# Altium PCB PCI Express Mini_3000X5095_52PIN_Full-Mini-Type F1.PCBDOC (part 7 of 8)
Units mm, origin at the board's own origin, x right, y up, seen from the top; angles counter-clockwise.
Board outline 70 x 83.2 mm, 6 copper layers (TopLayer, Layer 1, Layer 2, Layer 3, Layer 4, Bottom Layer), stack 0.914 mm thick; 380 components, 252 nets, 1258 pads, 603 vias.
Unrouted connection lines stored in the file: 10.
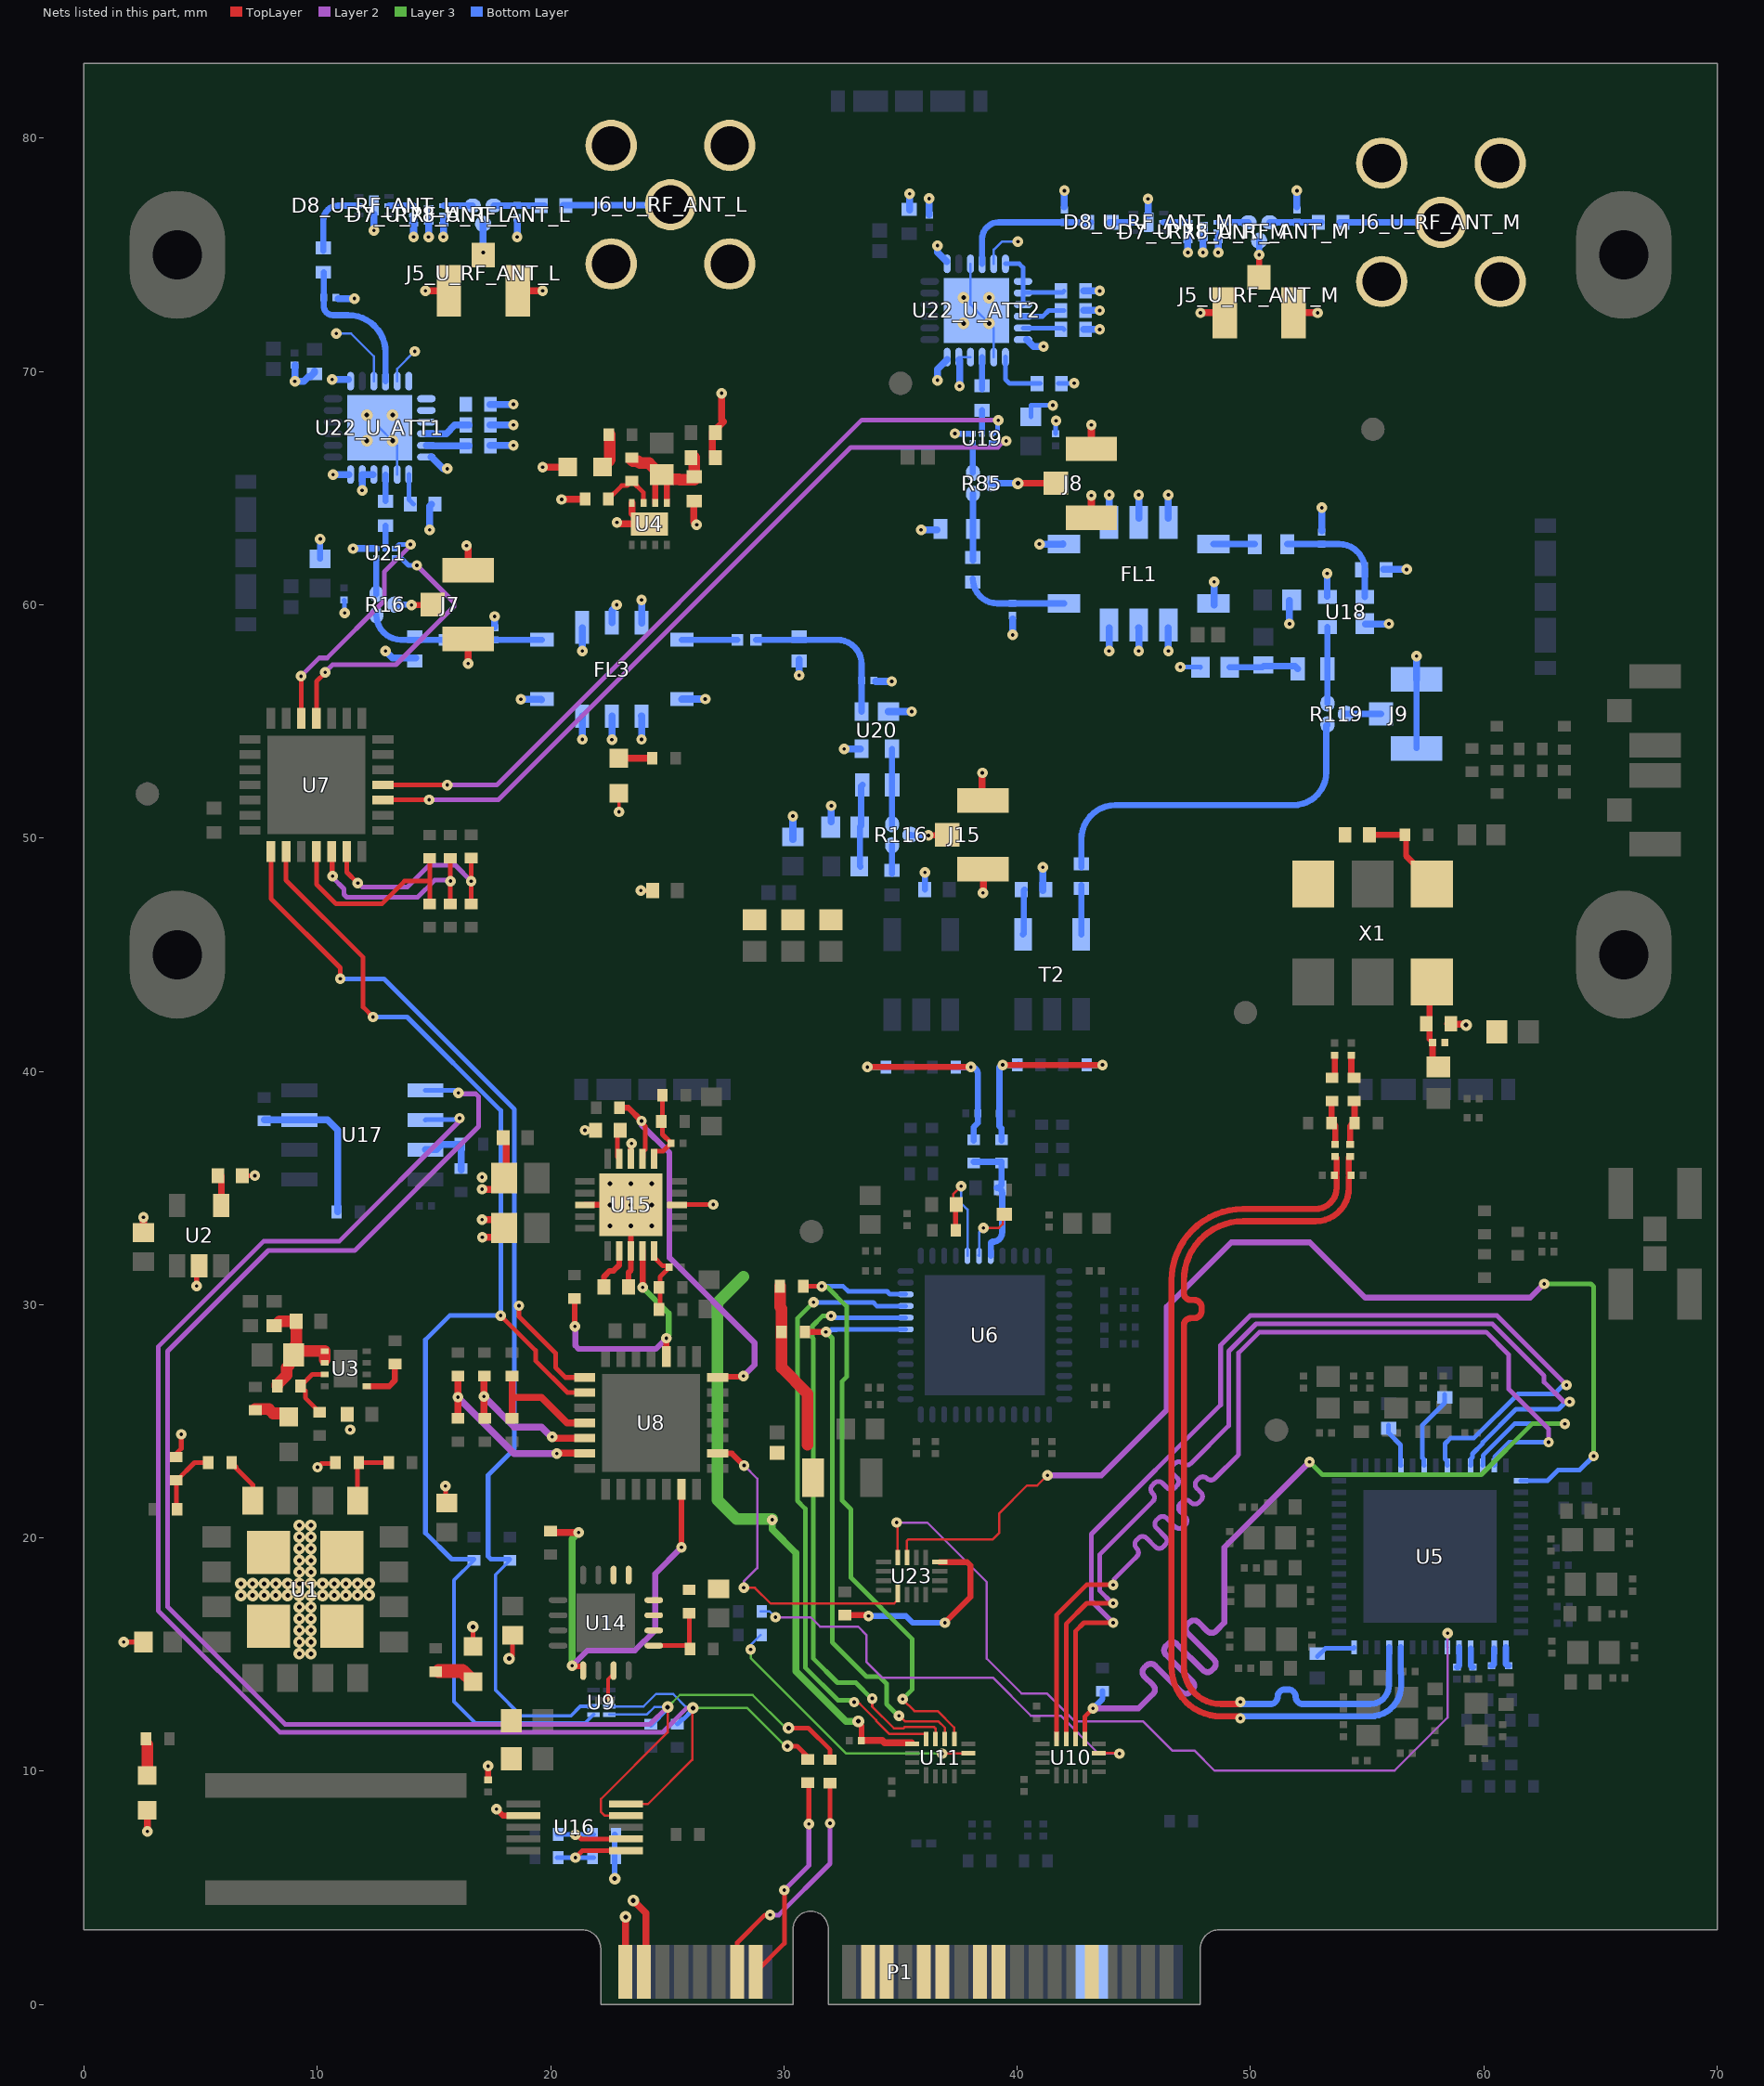
[diagram p8: the nets of this part, all layers, seen from the top]

## Via types
v1: diameter 0.45, hole 0.15, TopLayer to Bottom Layer, tented both sides, 332 vias
v2: diameter 0.5, hole 0.2, TopLayer to Bottom Layer, tented both sides, 214 vias
v3: diameter 0.5, hole 0.2, TopLayer to Bottom Layer, 32 vias
v4: diameter 0.45, hole 0.15, TopLayer to Bottom Layer, 25 vias

## Nets (pads, with @x,y where several pads share a name; then routed paths per layer and width w, separated by ;. In a path a pad name is that pad's centre, name@x,y a point inside that pad or via, vN(x,y) a via of type N, cw(c..) or ccw(c..) an arc to the next point about the centre after c; other vN are vias at no path point) (continued)
GND_ATT_U_ATT1: C4.1 C11.1 C12.1 C13.1 C48.1 C49.1 C156.2 C158.1 C161.2 C162.2 C163.1 C165.1 C166.1 C168.1 C169.1 C171.2 C172.2 C176.1 C177.1 C180_U_ATT1.1 C180_U_ATT2.1 C181_U_ATT1.1 C181_U_ATT2.1 C182_U_ATT1.2 C182_U_ATT2.2 C183_U_ATT1.2 C183_U_ATT2.2 C184_U_ATT1.2 C184_U_ATT2.2 C185_U_ATT1.2 C185_U_ATT2.2 C186_U_RF_ANT_L.1 C186_U_RF_ANT_M.1 C187_U_RF_ANT_L.1 C187_U_RF_ANT_M.1 C188.1 C190.1 D7_U_RF_ANT_L.2 D7_U_RF_ANT_L.3 D7_U_RF_ANT_L.4 D7_U_RF_ANT_L.5 D7_U_RF_ANT_L.7 D7_U_RF_ANT_M.2 D7_U_RF_ANT_M.3 D7_U_RF_ANT_M.4 D7_U_RF_ANT_M.5 D7_U_RF_ANT_M.7 D8_U_RF_ANT_L.7 D8_U_RF_ANT_M.7 D10.2 D13.2 FB32.2 FB33.2 FB34.2 FL1.A FL1.B FL1.C FL1.E FL1.F FL1.G FL1.H FL1.K FL3.1 FL3.2 FL3.3 FL3.6 FL3.7 FL3.8 FL3.9 FL3.10 J5_U_RF_ANT_L.1 J5_U_RF_ANT_L.3 J5_U_RF_ANT_M.1 J5_U_RF_ANT_M.3 J6_U_RF_ANT_L.MH J6_U_RF_ANT_M.MH J7.1 J7.3 J8.1 J8.3 J9.1 J9.3 J15.1 J15.3 L11.1 R9.1 U4.4 U4.9 U18.2 U18.4 U19.4 U20.2 U20.4 U21.4 U22_U_ATT1.1 U22_U_ATT1.3 U22_U_ATT1.5 U22_U_ATT1.12 U22_U_ATT1.14 U22_U_ATT1.16 U22_U_ATT1.17 U22_U_ATT1.18 U22_U_ATT1.25 U22_U_ATT2.1 U22_U_ATT2.3 U22_U_ATT2.5 U22_U_ATT2.12 U22_U_ATT2.14 U22_U_ATT2.16 U22_U_ATT2.17 U22_U_ATT2.18 U22_U_ATT2.25 | length 99
  TopLayer w0.15: v1(22.93,51.122) D10.2@22.93,51.922
  TopLayer w0.2: v1(23.869,47.75) C4.1@24.45,47.75
  TopLayer w0.3: v1(14.639,73.461) 15.637,73.461 J5_U_RF_ANT_L.3@15.64,73.457 ; v1(16.399,62.534) 16.399,62.507 16.472,62.435 J7.1@16.472,61.536 ; v1(16.472,57.48) J7.3@16.472,58.478 ; J5_U_RF_ANT_L.1@18.658,73.46 18.662,73.457 v1(19.66,73.457) ; v1(19.66,65.9) D13.2@20.657,65.9 ; v1(20.472,64.516) R9.1@21.47,64.516 ; v1(22.843,63.525) 22.905,63.463 U4.9@23.903,63.463 ; U4.4@23.484,64.363 23.484,63.913 23.934,63.463 U4.9@24.234,63.463 ; C11.1@26.14,64.549 26.14,63.551 v1(26.262,63.428) ; C12.1@26.932,66.306 C13.1@26.932,67.381 ; C13.1@26.939,67.381 27.407,67.849 27.33,67.925 v1(27.33,69.067) ; J15.1@38.488,52.008 v1@38.488,52.772 ; v1@38.553,47.674 J15.3@38.553,48.438 ; J8.3@43.179,63.996 v1(43.179,64.682) ; J8.1@43.179,67.018 v1(43.179,67.704) ; v1(47.854,72.514) 48.852,72.514 J5_U_RF_ANT_M.3@48.855,72.51 ; J5_U_RF_ANT_M.1@51.881,72.517 51.885,72.514 v1(52.883,72.514)
  Bottom Layer w0.1: v1(10.82,71.628) 11.449,71.628 12.426,70.652 U22_U_ATT1.3@12.426,69.581 ; U22_U_ATT1.25@12.676,67.581 v2(13.226,67.031) 13.426,66.831 U22_U_ATT1.14@13.426,65.581 ; U22_U_ATT1.5@13.426,69.581 13.426,70.114 v1(14.176,70.864) ; U22_U_ATT2.17@37.498,70.614 U22_U_ATT2.16@37.998,70.614 ; U22_U_ATT2.3@37.998,74.614 37.998,72.864 U22_U_ATT2.25@38.248,72.614 v2(38.798,72.064) 38.998,71.864 U22_U_ATT2.14@38.998,70.614 ; U22_U_ATT2.5@38.998,74.614 38.998,75.219 39.344,75.565 v1(40.03,75.565)
  Bottom Layer w0.2: C176.1@10.091,62.001 C176.1@10.121,61.971 ; C177.1@11.149,60.201 11.163,60.188 11.163,59.664 v1(11.176,59.651) ; C165.1@40.589,68.057 40.589,68.557 41.519,68.557 v1(41.527,68.548) ; C166.1@41.654,67.333 41.654,67.867 v1(41.67,67.883) ; C182_U_ATT2.2@41.764,69.479 42.424,69.479 v1(42.439,69.494) ; v1(46.99,57.328) 47.854,57.328 C162.2@47.86,57.322
  Bottom Layer w0.25: C176.1@10.121,61.971 10.121,62.818 v1(10.126,62.818) ; C156.2@36.042,47.788 36.044,47.79 36.044,48.52 v1(36.046,48.523) ; v1@37.335,67.329 U19.4@38.014,67.329 ; J9.1@57.119,53.847 J9.3@57.119,56.797
  Bottom Layer w0.268: U18.4@53.289,60.343 v1(53.289,61.341)
  Bottom Layer w0.3: C180_U_ATT1.1@9.041,70.268 v1(9.041,69.581) 9.427,69.581 9.621,69.775 9.706,69.775 9.881,69.95 C181_U_ATT1.1@9.881,70.025 ; v1(10.641,69.661) U22_U_ATT1.1@11.327,69.661 ; v1(10.676,65.581) U22_U_ATT1.18@11.362,65.581 ; C187_U_RF_ANT_L.1@10.902,73.126 v1(11.588,73.126) ; v1(11.532,62.409) U21.4@12.529,62.409 ; v1(11.926,64.901) U22_U_ATT1.17@11.926,65.581 U22_U_ATT1.16@12.392,65.581 ; v1(12.426,76.044) D8_U_RF_ANT_L.7@12.426,76.73 ; v1(12.922,58.019) 12.926,58.019 13.226,57.719 C48.1@14.223,57.719 ; v1(14.13,75.763) 14.13,76.555 ; v1(14.771,75.763) D7_U_RF_ANT_L.7@14.771,76.449 ; v1(14.818,63.208) 14.818,64.231 C182_U_ATT1.2@14.893,64.307 ; U22_U_ATT1.12@14.886,66.331 15.386,65.831 v1(15.569,65.831) ; v1(15.405,75.763) 15.405,76.563 ; C183_U_ATT1.2@17.412,66.831 v1(18.41,66.831) ; C184_U_ATT1.2@17.412,67.704 v1(18.41,67.704) ; C185_U_ATT1.2@17.412,68.591 v1(18.41,68.591) ; C190.1@17.598,59.054 v1(17.598,59.5) ; v1(18.57,75.763) C186_U_RF_ANT_L.1@18.57,76.449 ; v1(18.725,55.947) 18.731,55.953 19.594,55.953 FL3.10@19.616,55.931 ; FL3.9@21.357,55.229 21.36,55.225 v1(21.36,54.227) ; v1(21.36,58.02) FL3.1@21.36,59.018 ; FL3.8@22.627,55.223 22.63,55.22 v1(22.63,54.222) ; FL3.2@22.63,59.229 22.63,59.774 22.83,59.973 v1(22.83,59.995) ; FL3.7@23.897,55.229 23.9,55.225 v1(23.9,54.227) ; v1(23.9,60.21) FL3.3@23.9,59.229 23.9,59.212 FL3.3@23.903,59.209 ; FL3.6@25.628,55.956 FL3.6@25.63,55.959 v1(26.63,55.959) ; v1(30.384,50.94) C171.2@30.384,50.053 30.384,49.943 C171.2@30.388,49.939 ; v1(30.655,56.972) C49.1@30.655,57.658 ; C172.2@32.033,50.698 v1(32.033,51.384) ; v1(32.584,53.816) U20.4@33.27,53.816 ; C188.1@33.933,56.714 v1(34.619,56.714) ; U20.2@34.478,55.418 34.481,55.422 U20.2@34.483,55.422 v1(35.479,55.422) ; C181_U_ATT2.1@35.385,76.926 v1(35.385,77.612) ; v1(35.881,63.208) L11.1@36.567,63.208 ; C180_U_ATT2.1@36.229,76.726 v1(36.229,77.412) ; v1(36.581,69.623) 36.581,70.1 U22_U_ATT2.18@36.998,70.518 ; v1(36.581,75.393) 36.581,75.108 U22_U_ATT2.1@36.982,74.707 ; v1(37.328,67.336) v1@37.335,67.329 ; U22_U_ATT2.17@37.498,70.494 37.529,70.463 v1(37.529,69.369) ; v1(39.803,58.709) C163.1@39.803,59.395 ; U22_U_ATT2.12@40.411,71.364 40.705,71.069 v1(41.129,71.069) ; v1(40.956,62.6) 41.953,62.6 FL1.K@41.957,62.603 ; C158.1@41.097,47.745 v1(41.097,48.743) ; 42.022,77.064 v1(42.022,77.75) ; C183_U_ATT2.2@42.854,71.801 v1(43.54,71.801) ; C184_U_ATT2.2@42.854,72.614 v1(43.54,72.614) ; C185_U_ATT2.2@42.854,73.452 v1(43.54,73.452) ; FL1.H@43.937,59.021 43.94,59.018 v1(43.94,58.02) ; v1(43.942,64.708) 43.942,63.71 FL1.A@43.945,63.707 ; FL1.G@45.207,59.021 45.21,59.018 v1(45.21,58.02) ; v1(45.21,64.708) 45.21,63.71 FL1.B@45.213,63.707 ; D8_U_RF_ANT_M.7@45.61,76.707 v1(45.61,77.393) ; FL1.F@46.477,59.021 46.48,59.018 v1(46.48,58.02) ; v1(46.477,64.708) 46.477,63.71 FL1.C@46.48,63.707 ; v1(47.316,75.098) D7_U_RF_ANT_M.4@47.316,75.593 47.316,75.844 ; v1(47.966,75.098) D7_U_RF_ANT_M.7@47.966,75.784 ; FL1.E@48.438,59.988 v1(48.438,60.985) ; v1(48.616,75.098) D7_U_RF_ANT_M.3@48.616,75.593 48.616,75.844 ; v1(51.67,59.18) C161.2@51.67,60.178 ; 51.989,77.064 v1(51.989,77.75) ; C169.1@53.061,63.163 v1(53.061,64.16) ; U18.2@54.937,59.18 v1(55.935,59.18) ; C168.1@55.696,61.515 v1(56.694,61.515) ; v1(57.119,57.795) J9.3@57.119,56.797 J9.3@57.122,56.793
  other v1: 38.534,47.655 38.507,52.791
  other v2: 12.126,67.031 12.126,68.131 13.226,68.131 37.698,72.064 37.698,73.164 38.798,73.164
GND_VCXO: C42.1 C111.1 C112.1 FB15.1 X1.3 | length 0.8
  TopLayer w0.3: C112.1@58.453,42.044 58.483,42.014 59.214,42.014 v2(59.244,41.984)
GS_330: U7.17 U19.1 | length 33.8
  TopLayer w0.2: U7.17@12.817,51.627 12.828,51.639 v1(14.794,51.639)
  Layer 2 w0.2: v1(14.794,51.639) 14.806,51.65 17.768,51.65 32.869,66.751 39.172,66.751 39.444,67.024 v1(39.53,67.024)
  Bottom Layer w0.2: U19.1@38.898,66.931 39.37,66.931 39.463,67.024 v1(39.53,67.024)
GS_ILS: U7.25 U21.1 | length 12.3
  TopLayer w0.2: U7.25@9.967,55.127 9.967,56.398 9.967,56.713 10.338,57.084 v1(10.338,57.099)
  Layer 2 w0.2: v1(10.338,57.099) 10.338,57.116 10.585,57.364 10.656,57.434 13.37,57.434 15.864,59.928 15.864,60.094 v1(14.269,61.689)
  Bottom Layer w0.2: U21.1@13.329,62.009 13.592,62.009 13.912,61.689 v1(14.269,61.689)
I2C_SCL: R66.1 R71.2 U9.3 U16.5 U17.6 | length 72.3
  TopLayer w0.1: U16.5@23.227,8.594 24.173,8.594 26.069,10.49 26.069,12.68 v2(26.099,12.711)
  TopLayer w0.2: v2(30.156,11.077) 30.568,11.077 31.025,10.62 R71.2@31.025,10.454
  Layer 2 w0.2: v1(16.101,37.991) 16.101,37.871 10.953,32.724 7.71,32.724 3.181,28.195 3.181,16.885 8.406,11.66 24.79,11.66 25.842,12.711 v2(26.099,12.711)
  Layer 3 w0.1: v2(26.099,12.711) 28.429,12.711 30.064,11.077 v2(30.156,11.077)
  Bottom Layer w0.1: U9.3@22.514,12.781 23.988,12.781 24.517,13.311 25.255,13.311 25.855,12.711 26.069,12.711 v2(26.099,12.711)
  Bottom Layer w0.2: U17.6@14.637,37.914 14.654,37.931 16.101,37.931 v1(16.101,37.991) ; R66.1@25.429,12.019 25.629,12.219 25.679,12.219 26.069,12.609 v2@26.069,12.711
I2C_SDA: R65.1 R70.2 U9.4 U16.4 U17.5 | length 75
  TopLayer w0.1: U16.4@23.227,8.094 22.327,8.094 22.167,8.254 22.167,8.815 25.019,11.666 v2(25.019,12.751)
  TopLayer w0.2: v2(30.2,11.851) 31.05,11.851 31.982,10.918 R70.2@31.982,10.441
  Layer 2 w0.2: v1(16.054,39.074) 16.092,39.036 16.799,39.036 16.916,38.919 16.916,37.63 11.61,32.324 7.9,32.324 3.581,28.005 3.581,17.05 8.622,12.01 24.256,12.01 24.997,12.751 v2(25.019,12.751)
  Layer 3 w0.1: v2(25.019,12.751) 25.539,13.271 28.661,13.271 30.081,11.851 v2(30.2,11.851)
  Bottom Layer w0.1: U9.4@22.514,12.431 24.126,12.431 24.445,12.751 v2(25.019,12.751)
  Bottom Layer w0.2: U17.5@14.637,39.184 14.639,39.181 16.088,39.181 16.088,39.109 v1(16.054,39.074) ; R65.1@24.3,11.969 25.019,12.688 v2(25.019,12.751)
LMK_CLKin0_N: C46.1 U5.33 | length 0.9
  Bottom Layer w0.267: C46.1@58.847,14.465 ccw(c58.847,14.56) 58.943,14.56 U5.33@58.943,15.306
LMK_CLKin0_P: C47.1 U5.32 | length 0.8
  Bottom Layer w0.267: U5.32@59.443,15.247 59.443,14.56 ccw(c59.538,14.56) C47.1@59.538,14.465
LMK_CLKin1_N: C59.1 U5.30 | length 0.8
  Bottom Layer w0.267: C59.1@60.323,14.519 ccw(c60.323,14.639) 60.443,14.639 U5.30@60.443,15.247
LMK_CLKin1_P: C54.1 U5.29 | length 0.9
  Bottom Layer w0.267: U5.29@60.943,15.306 60.943,14.639 ccw(c61.063,14.639) C54.1@61.063,14.519
LMK_CLKsel: U5.34 U23.12 | length 36.6
  TopLayer w0.1: v1(34.832,20.66) 34.877,20.615 U23.12@34.877,19.164
  Layer 2 w0.1: v1(34.832,20.66) 36.144,20.66 38.693,18.111 38.693,14.825 40.185,13.333 41.261,13.333 42.454,12.139 45.39,12.139 46.644,10.885 47.603,10.885 48.46,10.028 56.173,10.028 58.448,12.303 v1(58.448,15.913)
  Bottom Layer w0.1: U5.34@58.443,15.306 58.429,15.32 58.429,15.893 v1(58.448,15.913)
LMK_CLKsel_3V3: U8.23 U23.1 | length 14.3
  TopLayer w0.1: v1(28.28,17.864) 28.761,17.864 29.436,17.189 34.727,17.189 34.877,17.339 U23.1@34.877,17.614
  TopLayer w0.25: U8.23@27.16,23.629 27.166,23.624 27.774,23.624 v1(28.294,23.104)
  Layer 2 w0.1: v1(28.28,17.864) 28.28,18.135 28.857,18.712 28.857,22.54 v1(28.294,23.104)
LMK_OSC_IN_N: C39.1 C41.1 U5.38 | length 40.9
  TopLayer w0.267: v1(49.567,12.261) ccw(c49.475,12.261) 49.475,12.353 48.727,12.353 cw(c48.727,14.465) 46.615,14.465 46.615,31.035 cw(c49.682,31.035) 49.682,34.102 52.789,34.102 ccw(c52.789,35.002) 53.689,35.002 53.689,35.44 ccw(c53.593,35.44) C39.1@53.593,35.536 ccw(c53.593,35.632) 53.689,35.632 C41.1@53.689,36.296
  Bottom Layer w0.267: v1(49.567,12.261) cw(c49.658,12.261) 49.658,12.353 55.136,12.353 ccw(c55.136,13.673) 56.456,13.673 56.456,14.187 56.443,14.2 U5.38@56.443,15.306
LMK_OSC_IN_P: C44.1 C45.2 U5.39 | length 40.9
  TopLayer w0.267: v1(49.567,12.971) cw(c49.475,12.971) 49.475,12.88 48.727,12.88 cw(c48.727,14.465) 47.142,14.465 47.142,28.204 47.142,29.113 cw(c47.452,29.113) 47.452,29.423 47.593,29.423 ccw(c47.593,29.733) 47.903,29.733 47.903,29.888 ccw(c47.593,29.888) 47.593,30.198 47.452,30.198 cw(c47.452,30.508) 47.142,30.508 47.142,31.035 cw(c49.682,31.035) 49.682,33.575 52.789,33.575 ccw(c52.789,35.002) 54.216,35.002 54.216,35.44 cw(c54.313,35.44) C45.2@54.313,35.536 cw(c54.313,35.632) 54.216,35.632 C44.1@54.216,36.299
  Bottom Layer w0.267: v1(49.567,12.971) ccw(c49.658,12.971) 49.658,12.88 50.718,12.88 50.852,12.88 ccw(c50.852,13.19) 51.162,13.19 cw(c51.472,13.19) 51.472,13.5 51.627,13.5 cw(c51.627,13.19) 51.937,13.19 ccw(c52.247,13.19) 52.247,12.88 52.843,12.88 55.136,12.88 ccw(c55.136,13.673) 55.929,13.673 55.929,14.187 55.943,14.2 U5.39@55.943,15.306
LMK_SPI_CLK: U5.13 U10.12 | length 44.6
  TopLayer w0.2: U10.12@41.695,11.379 41.695,16.708 42.973,17.986 v4(44.114,17.986)
  Layer 2 w0.2: v4(44.114,17.986) 44.162,18.034 44.162,18.239 45.059,19.135 45.13,19.206 ccw(c44.958,19.378) 45.13,19.549 45.114,19.565 cw(c45.286,19.736) 45.114,19.908 45.2,19.993 cw(c45.372,19.822) 45.543,19.993 45.917,19.62 ccw(c46.088,19.791) 46.26,19.62 46.346,19.705 ccw(c46.174,19.877) 46.346,20.048 45.972,20.422 cw(c46.143,20.594) 45.972,20.765 46.058,20.851 cw(c46.229,20.679) 46.401,20.851 46.774,20.477 ccw(c46.946,20.649) 47.117,20.477 47.203,20.563 ccw(c47.032,20.734) 47.203,20.906 46.985,21.124 cw(c47.157,21.296) 46.985,21.467 47.071,21.553 cw(c47.242,21.381) 47.414,21.553 47.445,21.522 ccw(c47.617,21.693) 47.788,21.522 47.874,21.607 ccw(c47.702,21.779) 47.874,21.95 47.702,22.122 cw(c47.874,22.293) 47.702,22.465 47.788,22.551 cw(c47.96,22.379) 48.131,22.551 ccw(c48.303,22.722) 48.474,22.551 49.463,23.54 49.495,23.572 49.495,27.934 50.388,28.827 60.1,28.827 61.069,27.858 61.069,26.379 62.775,24.673 v4(62.775,24.103)
  Bottom Layer w0.2: U5.13@60.443,23.106 60.463,23.126 60.463,23.47 61.095,24.103 v4(62.775,24.103)
LMK_SPI_CS: R12.1 U5.12 U10.9 | length 43.8
  TopLayer w0.2: U10.9@42.895,11.379 42.895,12.334 v1(43.251,12.69)
  Layer 2 w0.25: v1(43.251,12.69) 45.204,12.69 45.739,13.225 45.827,13.313 ccw(c45.642,13.499) 45.827,13.684 45.445,14.067 cw(c45.631,14.252) 45.445,14.438 45.538,14.531 cw(c45.724,14.345) 45.909,14.531 47.045,13.395 ccw(c47.231,13.581) 47.416,13.395 47.509,13.488 ccw(c47.324,13.674) 47.509,13.859 46.373,14.995 cw(c46.559,15.181) 46.373,15.366 46.466,15.459 cw(c46.652,15.273) 46.838,15.459 47.973,14.323 ccw(c48.159,14.509) 48.345,14.323 48.437,14.416 ccw(c48.252,14.602) 48.437,14.787 47.302,15.923 cw(c47.487,16.109) 47.302,16.295 47.395,16.387 cw(c47.58,16.202) 47.766,16.387 48.148,16.005 ccw(c48.334,16.191) 48.519,16.005 48.88,16.366 48.88,19.603 v1(52.532,23.254)
  Layer 3 w0.2: v1(52.532,23.254) 53.079,22.708 59.892,22.708 62.077,24.892 v4(63.475,24.892)
  Bottom Layer w0.2: U5.12@59.943,23.106 59.963,23.126 59.963,23.536 61.318,24.892 v4(63.475,24.892)
  Bottom Layer w0.25: v1(43.251,12.69) 43.658,13.097 R12.1@43.658,13.429
LMK_SPI_MISO: U5.9 U10.10 | length 44.8
  TopLayer w0.2: U10.10@42.495,11.379 42.495,15.998 42.863,16.366 v4(44.114,16.366)
  Layer 2 w0.2: v4(44.114,16.366) 43.179,17.301 43.179,20.161 48.72,25.701 48.72,28.266 49.981,29.527 60.567,29.527 v4(63.54,26.554)
  Bottom Layer w0.2: U5.9@58.443,23.106 58.423,23.126 58.423,23.306 58.343,23.386 58.343,24.041 58.588,24.287 59.582,24.287 61.461,26.166 63.018,26.166 63.406,26.554 v4(63.54,26.554)
LMK_SPI_MOSI: U5.11 U10.11 | length 44.6
  TopLayer w0.2: U10.11@42.095,11.379 42.095,16.31 42.981,17.196 v4(44.114,17.196)
  Layer 2 w0.2: v4(44.114,17.196) 44.078,17.196 43.529,17.744 43.529,19.279 45.741,21.491 45.812,21.562 ccw(c45.641,21.733) 45.812,21.905 45.797,21.92 cw(c45.968,22.092) 45.797,22.263 45.882,22.349 cw(c46.054,22.178) 46.226,22.349 46.42,22.155 ccw(c46.592,22.326) 46.763,22.155 46.849,22.24 ccw(c46.677,22.412) 46.849,22.583 46.67,22.763 cw(c46.841,22.934) 46.67,23.106 46.755,23.191 cw(c46.927,23.02) 47.098,23.191 ccw(c47.27,23.363) 47.442,23.191 49.059,24.809 49.07,24.819 49.07,28.004 50.243,29.177 60.362,29.177 62.586,26.953 62.586,26.68 63.435,25.832 v4(63.678,25.832)
  Bottom Layer w0.2: U5.11@59.443,23.106 59.463,23.126 59.463,23.41 59.513,23.46 59.513,23.61 59.96,24.058 59.96,24.099 61.38,25.519 63.198,25.519 63.511,25.832 v4(63.678,25.832)
LTC2122_CS: R15.1 U6.46 U11.9 | length 27.5
  TopLayer w0.1: v4(35.087,13.087) 35.597,12.577 36.596,12.577 37.3,11.873 U11.9@37.3,11.379
  TopLayer w0.2: R15.1@30.831,30.789 30.833,30.787 31.616,30.787 v1@31.618,30.789
  TopLayer w0.25: v1@31.618,30.789 v1(31.623,30.785)
  Layer 3 w0.2: v1(31.623,30.785) 31.661,30.747 31.866,30.747 32.687,29.926 32.687,26.9 32.503,26.716 32.503,21.594 32.87,21.227 32.87,18.301 35.507,15.664 35.507,13.507 v4(35.087,13.087)
  Bottom Layer w0.2: v1(31.623,30.785) 32.543,30.785 32.76,30.567 34.422,30.567 34.537,30.452 35.208,30.452 U6.46@35.217,30.442
LTC_SPI_CLK: U6.45 U11.12 | length 26.7
  TopLayer w0.1: v4(33.014,12.96) 33.081,12.893 33.255,12.893 33.953,12.195 33.953,12.17 34.529,11.594 36.05,11.594 36.1,11.544 U11.12@36.1,11.379
  Layer 3 w0.2: v1(31.267,30.099) 30.578,29.41 30.578,21.594 30.918,21.255 30.918,14.443 32.321,13.04 32.934,13.04 v4(33.014,12.96)
  Bottom Layer w0.2: v1(31.267,30.099) 33.824,30.099 33.98,29.942 U6.45@35.217,29.942
LTC_SPI_MISO: R14.1 U6.43 U11.10 | length 25.1
  TopLayer w0.1: v4(34.935,12.379) 34.945,12.379 35.183,12.141 36.621,12.141 36.9,11.862 U11.10@36.9,11.379
  TopLayer w0.25: R14.1@30.899,28.832 v1(31.803,28.832)
  Layer 3 w0.2: v1(31.803,28.832) 32.075,28.559 32.075,15.519 33.541,14.054 34.101,14.054 34.398,13.757 34.398,12.882 34.901,12.379 v4(34.935,12.379)
  Bottom Layer w0.2: v1(31.803,28.832) 31.851,28.88 31.996,28.88 32.045,28.929 32.263,28.929 32.277,28.942 U6.43@35.217,28.942
LTC_SPI_MOSI: U6.44 U11.11 | length 25.6
  TopLayer w0.1: v4(33.788,13.117) 33.788,12.77 34.713,11.844 35.136,11.844 35.18,11.889 36.441,11.889 36.5,11.83 U11.11@36.5,11.379
  Layer 3 w0.2: v1(32.021,29.514) 32.014,29.507 31.651,29.507 31.218,29.074 31.218,28.59 31.268,28.54 31.268,14.827 32.299,13.796 33.083,13.796 33.762,13.117 v4(33.788,13.117)
  Bottom Layer w0.2: v1(32.021,29.514) 32.089,29.514 32.16,29.442 U6.44@35.217,29.442
NetC5_2: C5.2 U2.4 | length 1.3
  TopLayer w0.279: C5.2@5.877,35.524 5.883,35.519 5.883,34.263 U2.4@5.888,34.258
NetC7_2: C7.2 C8.2 FB1.1 R6.2 U3.1 U3.2 | length 5.8
  TopLayer w0.5: C8.2@8.151,29.095 8.201,29.095 8.388,29.282 C7.2@9.101,29.282 9.101,28.181 9.275,28.007 U3.1@10.316,28.007 10.316,27.632 ; R6.2@8.286,26.507 8.286,26.572 8.694,26.98 8.694,27.303 8.786,27.395 8.786,27.646 FB1.1@8.986,27.846 FB1.1@8.986,28.181
NetC11_2: C11.2 C12.2 FB2.1 R8.2 U4.1 U4.2 | length 6.4
  TopLayer w0.25: U4.2@24.484,64.363 24.484,65.3 FB2.1@24.765,65.581 24.965,65.381 24.984,65.362 U4.1@24.984,64.363
  TopLayer w0.5: R8.2@23.482,66.256 23.482,66.206 23.532,66.156 23.738,66.156 23.824,66.07 24.226,66.07 24.715,65.581 FB2.1@24.765,65.581 ; FB2.1@24.965,65.381 25.507,65.381 25.532,65.356 26.152,65.356 C12.2@26.152,66.306
NetC35_2: C35.2 U5.42 | length 1.8
  Bottom Layer w0.2: C35.2@52.861,14.909 52.861,14.914 53.212,15.265 54.423,15.265 54.443,15.285 U5.42@54.443,15.306
NetC36_2: C36.2 U5.7 | length 3.5
  Bottom Layer w0.2: U5.7@57.443,23.106 57.423,23.126 57.423,23.375 57.374,23.423 57.374,24.843 58.326,25.794 C36.2@58.326,26.157
NetC37_2: C37.2 U5.5 | length 2
  Bottom Layer w0.2: C37.2@55.918,24.842 55.918,24.5 56.433,23.985 56.433,23.116 U5.5@56.443,23.106
NetC40_1: C40.1 R21.1 | length 1
  TopLayer w0.268: R21.1@53.493,39.725 53.519,39.725 53.61,39.816 C40.1@53.61,40.695
NetC41_2: C41.2 R19.1 R21.2 | length 2
  TopLayer w0.268: R21.2@53.493,38.725 ccw(c53.493,38.704) 53.472,38.704 R19.1@53.472,37.783 cw(c53.472,37.623) 53.632,37.623 C41.2@53.632,36.873
NetC42_2: C42.2 R20.2 X1.1 | length 4.3
  TopLayer w0.25: C42.2@54.964,50.14 56.669,50.14 56.669,49.234 57.773,48.129 X1.1@57.773,48.029
NetC43_1: C43.1 R22.1 | length 1
  TopLayer w0.268: C43.1@54.323,40.695 54.323,39.845 ccw(c54.443,39.845) R22.1@54.443,39.725
NetC44_2: C44.2 R22.2 R23.2 | length 2
  TopLayer w0.268: C44.2@54.271,36.873 54.271,37.592 cw(c54.463,37.592) R23.2@54.463,37.783 54.463,38.705 ccw(c54.443,38.705) R22.2@54.443,38.725
NetC48_2: C48.2 L6.1 R16.1 | length 3.5
  Bottom Layer w0.268: R16.1@12.532,59.559 ccw(c13.591,59.559) 13.591,58.499 14.176,58.499 L6.1@15.461,58.499
NetC49_2: C49.2 C188.2 L7.2 U20.1 | length 7.2
  Bottom Layer w0.268: L7.2@28.805,58.499 30.654,58.499 32.278,58.499 cw(c32.278,57.444) 33.333,57.444 33.333,56.754 U20.1@33.333,55.422
NetC62_2: C62.2 R46.1 R48.2 R50.2 | length 9.4
  TopLayer w0.268: v1(33.576,40.186) v1(38.014,40.186)
  Bottom Layer w0.268: v1(38.014,40.186) cw(c38.014,39.886) 38.313,39.886 C62.2@38.313,38.2 38.313,37.788 38.133,37.608 R50.2@38.133,37.022
  Bottom Layer w0.269: v1(33.576,40.186) R46.1@34.421,40.186 ; R48.2@37.317,40.186 v1(38.014,40.186)
NetC65_2: C65.2 R50.1 R54.2 U6.7 | length 5.7
  Bottom Layer w0.268: R50.1@38.133,36.122 39.329,36.122 39.329,35.2 cw(c39.133,35.2) C65.2@39.133,35.004
  Bottom Layer w0.269: U6.7@38.867,32.092 38.867,32.608 cw(c38.956,32.608) 38.956,32.696 ccw(c38.956,33.096) 39.355,33.096 39.355,34.782 ccw(c39.133,34.782) C65.2@39.133,35.004
NetC66_2: C66.2 R52.1 R54.1 R55.2 | length 9.1
  TopLayer w0.269: v1(39.381,40.275) v1(43.658,40.275)
  Bottom Layer w0.268: R54.1@39.329,37.022 39.329,37.56 39.237,37.652 C66.2@39.237,38.196 39.237,40.13 cw(c39.381,40.13) v1(39.381,40.275)
  Bottom Layer w0.269: v1(39.381,40.275) R55.2@40.056,40.275 ; R52.1@42.93,40.275 v1(43.658,40.275)
NetC73_2: C73.2 R96.2 U6.5 | length 5
  TopLayer w0.1: C73.2@37.253,34.288 37.253,34.728 v1(37.598,35.074)
  TopLayer w0.2: R96.2@37.317,33.186 ccw(c37.317,33.228) 37.359,33.228 C73.2@37.359,34.156
  Bottom Layer w0.1: v1(37.598,35.074) 37.598,34.349 37.867,34.079 U6.5@37.867,32.092
NetC74_2: C74.2 U6.6 | length 2.8
  TopLayer w0.1: v1(38.552,33.29) 39.22,33.29 39.381,33.451 39.381,33.938 C74.2@39.449,34.005
  Bottom Layer w0.1: U6.6@38.339,32.121 U6.6@38.367,32.092 38.367,33.093 38.552,33.277 v1(38.552,33.29)
NetC92_1: C92.1 U14.7 | length 1.4
  TopLayer w0.15: C92.1@22.583,13.023 22.469,13.137 22.469,13.948 22.698,14.177 U14.7@22.698,14.309
NetC111_2: C111.2 C112.2 FB12.2 X1.6 | length 3.6
  TopLayer w0.268: C111.2@57.673,41.379 57.673,42.044 57.673,43.729 X1.6@57.773,43.829 ; C111.2@57.803,41.239 57.803,40.437 FB12.2@58.054,40.186
NetC130_1: C130.1 R100.1 R101.2 U15.16 | length 3.4
  TopLayer w0.2: U15.16@24.445,36.254 24.445,36.539 24.485,36.579 24.824,36.579 25.16,36.915 C130.1@25.16,36.925 25.16,36.935 24.796,37.299 24.796,37.855 24.796,38.929 R101.2@24.845,38.978
NetC142_1: C142.1 R102.1 R103.1 U15.10 | length 3.1
  TopLayer w0.2: U15.10@24.445,32.304 24.445,32.019 24.808,31.656 25.036,31.656 25.086,31.606 C142.1@25.086,31.596 25.086,31.586 24.696,31.196 24.696,30.74 R103.1@24.696,29.791
NetC151_2: C151.2 U15.7 | length 1.9
  TopLayer w0.25: C151.2@22.291,30.764 22.291,31.205 22.533,31.448 22.698,31.448 22.945,31.695 U15.7@22.945,32.304
NetC152_2: C152.2 U15.19 | length 1.3
  TopLayer w0.2: U15.19@22.945,36.254 22.86,36.339 22.86,37.357 C152.2@22.978,37.475
NetC158_2: C158.2 T2.5 | length 1.9
  Bottom Layer w0.268: T2.5@40.248,45.873 40.281,45.906 40.281,47.755 C158.2@40.314,47.788
NetC159_U_RF_ANT_L_1: C159_U_RF_ANT_L.1 J6_U_RF_ANT_L.1 | length 4.6
  Bottom Layer w0.268: C159_U_RF_ANT_L.1@20.539,77.131 25.121,77.131 J6_U_RF_ANT_L.1@25.14,77.15
NetC159_U_RF_ANT_L_2: C159_U_RF_ANT_L.2 C186_U_RF_ANT_L.2 R78_U_RF_ANT_L.2 | length 2.2
  Bottom Layer w0.268: R78_U_RF_ANT_L.2@17.559,77.112 C186_U_RF_ANT_L.2@18.57,77.112 19.74,77.112 C159_U_RF_ANT_L.2@19.721,77.093
NetC159_U_RF_ANT_M_1: C159_U_RF_ANT_M.1 J6_U_RF_ANT_M.1 | length 4.3
  Bottom Layer w0.268: C159_U_RF_ANT_M.1@53.823,76.393 J6_U_RF_ANT_M.1@58.164,76.393
NetC159_U_RF_ANT_M_2: C159_U_RF_ANT_M.2 C186_U_RF_ANT_M.2 R78_U_RF_ANT_M.2 | length 2.2
  Bottom Layer w0.268: R78_U_RF_ANT_M.2@50.818,76.393 C186_U_RF_ANT_M.2@51.989,76.393 C159_U_RF_ANT_M.2@53.043,76.393
NetC160_U_RF_ANT_L_1: C160_U_RF_ANT_L.1 D8_U_RF_ANT_L.5 | length 3.2
  Bottom Layer w0.268: C160_U_RF_ANT_L.1@10.258,75.165 10.258,76.473 cw(c10.897,76.473) 10.897,77.112 D8_U_RF_ANT_L.5@11.777,77.112
NetC160_U_RF_ANT_L_2: C160_U_RF_ANT_L.2 C187_U_RF_ANT_L.2 U22_U_ATT1.4 | length 6.5
  Bottom Layer w0.268: C160_U_RF_ANT_L.2@10.276,74.256 C187_U_RF_ANT_L.2@10.276,73.164 10.276,72.815 ccw(c10.676,72.815) 10.676,72.415 11.328,72.415 cw(c11.328,70.815) 12.929,70.815 12.929,69.581 U22_U_ATT1.4@12.926,69.581
NetC160_U_RF_ANT_M_1: C160_U_RF_ANT_M.1 D8_U_RF_ANT_M.5 | length 1
  Bottom Layer w0.268: C160_U_RF_ANT_M.1@43.942,76.393 D8_U_RF_ANT_M.5@44.979,76.393
NetC160_U_RF_ANT_M_2: C160_U_RF_ANT_M.2 C187_U_RF_ANT_M.2 U22_U_ATT2.4 | length 6.1
  Bottom Layer w0.268: U22_U_ATT2.4@38.498,74.614 38.498,75.686 cw(c39.205,75.686) 39.205,76.393 C187_U_RF_ANT_M.2@42.022,76.393 C160_U_RF_ANT_M.2@43.162,76.393
NetC162_1: C162.1 L9.2 R84.1 | length 3
  Bottom Layer w0.269: C162.1@49.11,57.322 50.508,57.322 50.555,57.37 L9.2@51.907,57.37
  Bottom Layer w0.279: L9.2@51.907,57.37 L9.2@52.023,57.254
NetC163_2: C163.2 C167.2 FL1.J | length 4.5
  Bottom Layer w0.268: C167.2@38.098,61.114 ccw(c39.151,61.114) 39.151,60.06 C163.2@39.788,60.06 FL1.J@42.01,60.06
NetC164_1: C164.1 R119.1 | length 15.4
  Bottom Layer w0.268: C164.1@42.748,48.755 42.748,49.952 cw(c44.205,49.952) 44.205,51.41 51.829,51.41 ccw(c51.829,52.829) 53.248,52.829 53.248,54.822 ccw(c53.248,54.872) R119.1@53.298,54.872
NetC164_2: C164.2 T2.4 | length 2.1
  Bottom Layer w0.268: T2.4@42.748,45.873 C164.2@42.748,47.975
NetC167_1: C167.1 L11.2 R85.1 | length 2.9
  Bottom Layer w0.268: C167.1@38.098,61.894 38.104,61.894 L11.2@38.104,63.25 38.104,64.758 R85.1@38.098,64.758
NetC168_2: C168.2 C169.2 L10.2 U18.1 | length 5.1
  Bottom Layer w0.268: L10.2@51.58,62.6 C169.2@53.043,62.6 53.801,62.6 cw(c53.801,61.504) 54.898,61.504 U18.1@54.898,60.34
NetC172_1: C172.1 L8.2 R126.1 | length 3.6
  Bottom Layer w0.269: R126.1@33.283,48.78 33.258,48.805 C172.1@33.258,50.469 33.311,50.523 33.311,52.228 L8.2@33.365,52.282
NetC173_1: C173.1 U22_U_ATT2.15 | length 2.5
  Bottom Layer w0.268: U22_U_ATT2.15@38.498,70.39 38.498,69.251 U22_U_ATT2.15@38.498,70.614
NetC173_2: C173.2 U19.5 | length 1
  Bottom Layer w0.268: U19.5@38.498,67.331 C173.2@38.498,68.336
NetC175_2: C175.2 R116.1 | length 1.2
  Bottom Layer w0.268: C175.2@34.637,48.48 R116.1@34.637,49.69
NetC178_1: C178.1 U22_U_ATT1.15 | length 1.1
  Bottom Layer w0.268: U22_U_ATT1.15@12.926,65.581 12.926,64.44 C178.1@12.929,64.44
NetC178_2: C178.2 U21.5 | length 1
  Bottom Layer w0.268: U21.5@12.929,62.409 C178.2@12.929,63.39
NetC182_U_ATT1_1: C182_U_ATT1.1 U22_U_ATT1.13 | length 1.4
  Bottom Layer w0.2: U22_U_ATT1.13@13.926,65.581 13.926,64.517 13.955,64.488 13.955,64.483 14.125,64.313 C182_U_ATT1.1@14.13,64.313
NetC182_U_ATT2_1: C182_U_ATT2.1 U22_U_ATT2.13 | length 2.5
  Bottom Layer w0.2: U22_U_ATT2.13@39.498,70.614 39.498,69.661 39.679,69.479 C182_U_ATT2.1@40.984,69.479
NetC183_U_ATT1_1: C183_U_ATT1.1 U22_U_ATT1.11 | length 1.8
  Bottom Layer w0.3: U22_U_ATT1.11@14.676,66.831 14.926,66.831 14.944,66.813 C183_U_ATT1.1@16.504,66.813
NetC183_U_ATT2_1: C183_U_ATT2.1 U22_U_ATT2.11 | length 1.8
  Bottom Layer w0.2: U22_U_ATT2.11@40.248,71.864 41.949,71.864 C183_U_ATT2.1@42.012,71.801
NetC184_U_ATT1_1: C184_U_ATT1.1 U22_U_ATT1.10 | length 2
  Bottom Layer w0.3: U22_U_ATT1.10@14.676,67.331 15.526,67.331 15.896,67.702 C184_U_ATT1.1@16.504,67.702
NetC184_U_ATT2_1: C184_U_ATT2.1 U22_U_ATT2.10 | length 1.9
  Bottom Layer w0.2: U22_U_ATT2.10@40.248,72.364 41.097,72.364 41.347,72.614 C184_U_ATT2.1@42.007,72.614
NetC185_U_ATT1_1: C185_U_ATT1.1 U22_U_ATT1.6 U22_U_ATT1.7 U22_U_ATT1.8 U22_U_ATT1.9
NetC185_U_ATT2_1: C185_U_ATT2.1 U22_U_ATT2.6 U22_U_ATT2.7 U22_U_ATT2.8 U22_U_ATT2.9 | length 4.2
  Bottom Layer w0.2: U22_U_ATT2.6@39.498,74.614 40.091,74.614 40.248,74.456 U22_U_ATT2.7@40.248,73.864 U22_U_ATT2.8@40.248,73.364 ; U22_U_ATT2.9@40.248,72.864 U22_U_ATT2.8@40.248,73.364 ; C185_U_ATT2.1@42.012,73.452 41.943,73.383 40.267,73.383 U22_U_ATT2.8@40.248,73.364
NetC190_2: C190.2 FL3.12 L6.2 | length 3.4
  Bottom Layer w0.268: L6.2@16.261,58.499 C190.2@17.609,58.499 FL3.12@19.63,58.499
NetD7_U_RF_ANT_L_1: D7_U_RF_ANT_L.1 R78_U_RF_ANT_L.1 | length 1.2
  Bottom Layer w0.268: D7_U_RF_ANT_L.1@15.421,77.112 R78_U_RF_ANT_L.1@16.659,77.112
NetD7_U_RF_ANT_L_6: D7_U_RF_ANT_L.6 D8_U_RF_ANT_L.2 | length 1
  Bottom Layer w0.268: D8_U_RF_ANT_L.2@13.077,77.112 D7_U_RF_ANT_L.6@14.121,77.112
NetD7_U_RF_ANT_M_1: D7_U_RF_ANT_M.1 R78_U_RF_ANT_M.1 | length 1.3
  Bottom Layer w0.268: D7_U_RF_ANT_M.1@48.616,76.393 R78_U_RF_ANT_M.1@49.918,76.393
NetD7_U_RF_ANT_M_6: D7_U_RF_ANT_M.6 D8_U_RF_ANT_M.2 | length 1
  Bottom Layer w0.268: D8_U_RF_ANT_M.2@46.279,76.393 D7_U_RF_ANT_M.6@47.316,76.393
NetD9_1: D9.1 R120.1 | length 1.7
  TopLayer w0.6: R120.1@15.211,14.299 16.219,14.299 D9.1@16.674,13.844
NetD10_1: D10.1 R122.1 | length 1.5
  TopLayer w0.3: D10.1@22.93,53.422 R122.1@24.407,53.422
NetD11_1: D11.1 R121.1 | length 1.3
  TopLayer w0.5: D11.1@2.715,9.825 R121.1@2.715,11.146
NetD12_1: D12.1 R124.1 | length 1.6
  TopLayer w0.5: R124.1@7.339,25.525 7.929,25.525 8.115,25.339 8.626,25.339 D12.1@8.776,25.189
NetD13_1: D13.1 R125.1 | length 1.5
  TopLayer w0.5: D13.1@22.232,65.906 22.54,66.215 R125.1@22.54,67.291
NetFL1_D: FL1.D L10.1 | length 1.8
  Bottom Layer w0.268: FL1.D@48.41,62.6 L10.1@50.18,62.6
NetFL3_4: FL3.4 L7.1 | length 2.4
  Bottom Layer w0.268: FL3.4@25.63,58.499 L7.1@28.005,58.499
NetJ5_U_RF_ANT_L_2: J5_U_RF_ANT_L.2 R78_U_RF_ANT_L.3 | length 1.2
  Bottom Layer w0.3: v1(17.109,75.105) R78_U_RF_ANT_L.3@17.109,76.325
NetJ5_U_RF_ANT_M_2: J5_U_RF_ANT_M.2 R78_U_RF_ANT_M.3 | length 1.6
  TopLayer w0.268: J5_U_RF_ANT_M.2@50.368,74.039 v1(50.368,75)
  Bottom Layer w0.268: v1(50.368,75) R78_U_RF_ANT_M.3@50.368,75.606
NetJ7_2: J7.2 R16.3 | length 1.5
  TopLayer w0.268: v1(14.042,59.985) J7.2@14.774,59.985
  Bottom Layer w0.268: R16.3@13.319,60.009 14.018,60.009 v1(14.042,59.985)
NetJ8_2: J8.2 R85.3 | length 2.8
  TopLayer w0.268: v2(40.03,65.208) J8.2@41.654,65.208
  Bottom Layer w0.268: R85.3@38.885,65.208 v2(40.03,65.208)
NetJ9_2: J9.2 R119.3 | length 1.5
  Bottom Layer w0.268: R119.3@54.085,55.322 J9.2@55.594,55.322
NetJ15_2: J15.2 R116.3 | length 1.6
  TopLayer w0.268: v1(36.195,50.114) 36.978,50.114 J15.2@37.004,50.14
  Bottom Layer w0.268: R116.3@35.424,50.14 35.45,50.114 v1(36.195,50.114)
NetL8_1: L8.1 R116.2 U20.3 | length 3.3
  Bottom Layer w0.268: U20.3@34.633,53.822 34.637,53.818 R116.2@34.637,50.54
NetL9_1: L9.1 R119.2 U18.3 | length 3.3
  Bottom Layer w0.268: R119.2@53.298,55.772 L9.1@53.298,57.254 U18.3@53.298,59.04
NetR1_1: R1.1 R3.2 R5.2 | length 3
  TopLayer w0.2: R1.1@3.947,21.226 3.955,21.234 R5.2@3.955,22.52 ; R5.2@3.994,22.483 4.74,23.229 R3.2@5.378,23.229
NetR2_1: R2.1 R4.2 U1.13 | length 3
  TopLayer w0.2: U1.13@11.735,21.594 11.728,21.601 11.728,23.229 R2.1@13.112,23.229
NetR3_1: R3.1 U1.16 | length 2.1
  TopLayer w0.2: R3.1@6.278,23.229 R3.1@6.328,23.229 6.528,23.029 6.528,22.979 7.235,22.273 U1.16@7.235,21.594
NetR6_1: R6.1 R7.2 U3.3 | length 2.8
  TopLayer w0.2: R6.1@9.236,26.507 R6.1@9.286,26.507 ; R7.2@10.102,25.339 R7.2@10.102,25.389 9.486,26.005 9.486,26.307 R6.1@9.286,26.507 ; U3.3@10.316,27.007 9.786,27.007 R6.1@9.286,26.507
NetR8_1: R8.1 R9.2 U4.3 | length 2.6
  TopLayer w0.2: R9.2@22.432,64.538 R9.2@22.482,64.538 23.05,65.106 23.282,65.106 R8.1@23.482,65.306 ; R8.1@23.482,65.356 R8.1@23.482,65.306 ; U4.3@23.984,64.363 23.984,64.804 R8.1@23.482,65.306
NetR13_1: R13.1 U11.7 | length 12.2
  TopLayer w0.1: v1(36.784,10.754) 37.875,10.754 U11.7@37.9,10.779
  Layer 3 w0.1: v1(28.577,15.216) 28.577,14.845 32.668,10.754 v1(36.784,10.754)
  Bottom Layer w0.1: v1(28.577,15.216) 28.577,15.413 R13.1@29,15.836
NetR16_2: R16.2 U21.3 | length 1.4
  Bottom Layer w0.268: R16.2@12.532,60.459 U21.3@12.532,61.9
NetR57_2: R57.2 R60.2 U7.11 | length 9.1
  TopLayer w0.2: U7.11@9.967,49.427 9.967,48.021 10.808,47.18 12.766,47.18 13.741,48.154 14.818,48.154 ; R57.2@14.818,47.127 14.818,48.154 ; R60.2@14.818,49.182 14.818,48.154
NetR58_2: R58.2 R61.2 U7.12 | length 9.1
  TopLayer w0.2: U7.12@10.617,49.427 10.638,49.406 10.638,48.389 v1(10.659,48.368) ; R58.2@15.707,47.127 v1(15.707,48.154) R61.2@15.707,49.182
  Layer 2 w0.2: v1(10.659,48.368) 10.659,48.313 11.149,47.823 11.149,47.579 11.266,47.462 14.298,47.462 15.031,48.195 15.525,48.195 15.527,48.193 15.668,48.193 v1(15.707,48.154)
NetR59_2: R59.2 R62.2 U7.13 | length 9.2
  TopLayer w0.2: U7.13@11.267,49.427 11.267,48.536 v1(11.737,48.066) ; R59.2@16.596,47.127 v1(16.596,48.153) R62.2@16.596,49.189
  Layer 2 w0.2: v1(11.737,48.066) 11.757,48.066 11.917,47.906 13.87,47.906 14.795,48.832 15.917,48.832 v1(16.596,48.153)
NetR67_2: R67.2 R72.2 U8.11 | length 5.5
  TopLayer w0.3: R72.2@18.351,25.073 18.351,26.033 ; R67.2@18.351,26.992 18.351,26.033 ; U8.11@21.46,24.929 20.713,24.929 19.61,26.033 18.351,26.033
NetR68_2: R68.2 R73.2 U8.12 | length 7.6
  TopLayer w0.3: R68.2@17.162,26.992 17.174,26.98 17.145,26.95 v1(17.145,26.06) 17.145,25.115 R73.2@17.187,25.073 ; v1(20.066,24.333) 20.107,24.333 20.16,24.279 U8.12@21.46,24.279
  Layer 2 w0.3: v1(17.145,26.06) 18.447,24.758 19.612,24.758 ; 19.612,24.758 19.792,24.579 ; 19.612,24.758 19.792,24.579 ; 19.792,24.579 v1@20.037,24.333 ; 19.792,24.579 v1@20.037,24.333 ; v1@20.037,24.333 v1(20.066,24.333) v1@20.037,24.333
NetR69_2: R69.2 R74.2 U8.13 | length 8.4
  TopLayer w0.3: R74.2@16.032,25.073 v1(16.032,26.033) R69.2@16.032,26.992 ; v1(20.267,23.621) 20.276,23.629 U8.13@21.46,23.629
  Layer 2 w0.3: v1(16.032,26.033) 18.444,23.621 v1(20.267,23.621)
NetR75_2: R75.2 U23.8 | length 8.7
  TopLayer w0.25: R75.2@32.61,16.689 33.593,16.689 v1(33.628,16.654) ; U23.8@36.677,18.964 37.854,18.964 38,18.818 38,17.463 v1(36.902,16.366)
  Bottom Layer w0.25: v1(33.628,16.654) 35.227,16.654 35.516,16.366 v1(36.902,16.366)
NetR85_2: R85.2 U19.3 | length 1.3
  Bottom Layer w0.268: R85.2@38.098,65.658 U19.3@38.098,66.931
NetR87_1: R87.1 U10.7 | length 19.5
  TopLayer w0.1: U10.7@43.495,10.779 43.503,10.787 44.351,10.787 v1(44.384,10.754)
  Layer 2 w0.1: v1(29.638,16.602) 31.151,16.602 31.559,16.194 33.185,16.194 33.544,15.835 33.544,14.674 34.208,14.01 38.953,14.01 40.583,12.379 41.861,12.379 43.486,10.754 v1(44.384,10.754)
  Bottom Layer w0.1: R87.1@29,16.852 29.388,16.852 v1(29.638,16.602)
NetR98_1: R98.1 R99.2 U14.9 | length 3.1
  TopLayer w0.2: U14.9@24.423,15.384 R99.2@25.883,15.384 ; R98.1@25.942,16.826 25.942,15.325 R99.2@26.025,15.242
NetR108_1: R108.1 R110.2 U16.2 | length 3.8
  TopLayer w0.2: v1(21.064,7.285) 21.118,7.285 21.309,7.094 U16.2@23.227,7.094
  Bottom Layer w0.2: R110.2@20.275,7.285 v1(21.064,7.285) R108.1@21.853,7.285
NetR109_1: R109.1 R111.2 U16.1 | length 3.9
  TopLayer w0.2: v1(21.062,6.294) 21.362,6.594 U16.1@23.227,6.594
  Bottom Layer w0.2: R111.2@20.28,6.294 v1(21.062,6.294) R109.1@21.844,6.294
NetR112_1: R112.1 R115.2 U17.7 | length 2.7
  Bottom Layer w0.3: U17.7@14.637,36.644 15.112,36.644 15.34,36.872 16.161,36.872 R112.1@16.161,35.78
NetR113_1: R113.1 R114.2 U17.3 | length 6.8
  Bottom Layer w0.3: R114.2@7.728,37.931 7.737,37.922 9.228,37.922 U17.3@9.237,37.914 10.439,37.914 10.877,37.475 R113.1@10.877,33.977
NetR123_2: R123.2 U3.5 | length 2
  TopLayer w0.25: U3.5@12.116,26.507 13.081,26.507 13.326,26.752 R123.2@13.326,27.452
PER0_N: P1.21
PER0_P: P1.19
PER1_N: P1.27
PER1_P: P1.25
PER2_N: P1.33
PER2_P: P1.31
PERST2#: P1.43
PET3_N: P1.44
PET3_P: P1.42
PG_LMK_1V8: R105.1 U8.3 U15.9 | length 11.2
  TopLayer w0.25: R105.1@21.033,30.253 21.033,29.078 v1(21.044,29.068) ; U15.9@23.945,32.304 23.949,32.301 23.949,30.744 v1(23.952,30.74) ; U8.3@24.96,27.779 v1(24.96,28.559)
  Layer 2 w0.25: v1(21.044,29.068) 21.059,29.052 21.059,28.246 21.206,28.099 24.501,28.099 v1(24.96,28.559)
  Layer 3 w0.25: v1(23.952,30.74) 25.06,29.632 25.06,28.713 24.96,28.613 v1(24.96,28.559)
PG_LMK_3V3: R104.1 U8.28 U15.17 | length 17.2
  TopLayer w0.2: v1(23.898,37.874) 23.898,37.806 24.059,37.645 24.059,36.786 24.051,36.779 24.051,36.645 23.985,36.579 23.985,36.294 U15.17@23.945,36.254
  TopLayer w0.25: R104.1@22.96,38.442 23.33,38.442 v1(23.898,37.874) ; U8.28@27.16,26.879 27.193,26.912 28.235,26.912 v1(28.264,26.941)
  Layer 2 w0.25: v1(23.898,37.874) 23.898,37.711 25.096,36.513 25.096,32.009 28.744,28.361 28.744,27.421 v1(28.264,26.941)
PG_LTC2122: R97.1 U8.20 U14.5 | length 18.2
  TopLayer w0.25: v1(20.923,14.52) 20.952,14.492 U14.5@21.398,14.492 ; v1(25.61,19.594) U8.20@25.61,22.079
  TopLayer w0.3: R97.1@19.993,20.241 19.997,20.237 21.201,20.237 v1(21.205,20.233)
  Layer 2 w0.25: v1(20.923,14.52) 21.576,15.174 23.613,15.174 24.481,16.042 24.481,18.465 v1(25.61,19.594)
  Layer 3 w0.3: v1(20.923,14.52) 20.923,19.951 v1(21.205,20.233)
PGND: C1.1 C2.1 C3.1 C5.1 C6.1 C10.1 C91.1 C139.1 C140.1 C151.1 C152.1 C153.1 D9.2 D11.2 FB30.1 FB31.1 P1.1 P1.3 R4.1 R5.1 R108.2 R109.2 U1.EP U2.2 U15.3 U15.8 U15.13 U15.18 U15.21 U16.7 | length 29.3
  TopLayer w0.2: v1(1.702,15.538) C1.1@2.55,15.538 C1.1@2.606,15.538 ; R5.1@3.955,23.619 4.171,23.835 v1(4.171,24.445) ; v1(4.827,30.8) 4.827,31.435 U2.2@4.938,31.545 ; C5.1@6.657,35.524 C5.1@6.792,35.524 v1@7.332,35.524 ; v1(10.008,23.026) 10.179,23.197 R4.1@10.797,23.197 ; v1(15.494,22.225) 15.494,21.563 C2.1@15.558,21.5 ; D9.2@16.674,15.344 v2(16.674,16.194) ; v2(18.227,14.823) 18.257,14.823 18.376,14.942 C91.1@18.376,15.834 ; v1(21.47,37.475) C152.1@21.928,37.475 C152.1@22.051,37.475 ; U15.13@25.577,34.278 25.587,34.288 v1(26.969,34.288)
  TopLayer w0.25: C153.1@17.323,9.627 v1(17.323,10.22) ; v1(17.681,8.375) 17.961,8.094 U16.7@18.827,8.094 ; U15.3@21.47,34.279 v2(22.545,34.279) v2(23.445,34.279) v2(23.445,33.379) U15.8@23.445,32.304 23.445,31.482 23.341,31.377 C151.1@23.341,30.764 ; U15.18@23.445,36.254 23.445,36.882 v1(23.47,36.906)
  TopLayer w0.3: C3.1@2.55,33.183 v1(2.55,33.747) ; v1(2.715,7.421) D11.2@2.715,8.325 ; v1(17.061,33.648) C139.1@17.625,33.647 ; v1@17.061,34.946 C140.1@17.625,34.946 ; v1(17.074,32.886) C139.1@17.638,32.885 ; C140.1@18.011,35.427 18.101,35.517 C10.1@18.101,37.154 ; P1.1@23.2,1.4 23.214,1.414 v2(23.214,3.759) ; v2(23.548,4.456) 24.086,3.917 24.086,1.414 P1.3@24.072,1.4
  Bottom Layer w0.25: v2(22.753,5.397) 22.749,5.401 22.749,6.29 22.744,6.294 22.749,6.299 22.749,7.28 R108.2@22.753,7.285
  other v1: 11.408,24.638 17.061,34.947 17.06,35.46 7.329,35.53
  other v2: 9.228,15.038 9.728,15.038 9.228,15.538 9.728,15.538 9.228,16.038 9.728,16.038 9.228,16.538 9.728,16.538 9.229,17.039 9.729,17.039 6.729,17.538 7.229,17.538 7.729,17.538 8.229,17.538 8.729,17.539 9.229,17.539 9.729,17.539 10.229,17.539 10.729,17.539 11.229,17.539 11.728,17.539 12.228,17.54 6.729,18.038 7.229,18.038 7.729,18.038 8.229,18.038 8.729,18.039 9.229,18.039 9.729,18.039 10.229,18.039 10.729,18.039 11.229,18.039 11.728,18.039 12.228,18.04 9.229,18.539 9.729,18.539 9.228,19.039 9.728,19.039 9.228,19.539 9.728,19.539 9.228,20.039 9.728,20.039 9.228,20.539 9.728,20.539 22.545,33.379 24.345,33.379 24.345,34.279 22.545,35.179 23.445,35.179 24.345,35.179
PON_330: U7.18 U19.6 | length 33.6
  TopLayer w0.2: U7.18@12.817,52.277 12.826,52.269 15.568,52.269 v1(15.572,52.273)
  Layer 2 w0.2: v1(15.572,52.273) 17.694,52.273 33.342,67.921 39.179,67.921 v1(39.191,67.91)
  Bottom Layer w0.2: U19.6@38.898,67.331 38.923,67.356 39.035,67.356 39.152,67.473 39.152,67.871 v1(39.191,67.91)
PON_ILS: U7.26 U21.6 | length 10.3
  TopLayer w0.2: v1(9.302,56.938) 9.309,56.931 9.309,55.135 U7.26@9.317,55.127
  Layer 2 w0.2: v1(9.302,56.938) 10.083,57.719 10.422,57.719 12.878,60.175 12.878,61.418 13.995,62.535 v1(13.995,62.586)
  Bottom Layer w0.2: U21.6@13.329,62.409 13.505,62.586 v1(13.995,62.586)
ResetN_1V8: U5.15 U23.11 | length 50.6
  TopLayer w0.1: U23.11@35.277,19.164 35.277,19.885 35.335,19.944 38.959,19.944 39.231,20.216 39.231,21.054 40.42,22.243 40.857,22.243 v1(41.3,22.685)
  Layer 2 w0.25: v1(41.3,22.685) 43.609,22.685 46.406,25.482 46.406,29.902 49.177,32.673 52.544,32.673 54.915,30.302 61.996,30.302 v1(62.586,30.892)
  Layer 3 w0.2: v1(62.586,30.892) 64.587,30.892 64.704,30.775 v1(64.704,23.506)
  Bottom Layer w0.2: U5.15@61.593,22.456 62.732,22.456 63.182,22.906 64.104,22.906 v1(64.704,23.506)
SCK: R11.2 U7.8 U8.8 U9.6 | length 52.5
  TopLayer w0.2: U7.8@8.017,49.427 8.017,47.402 10.983,44.436 v1(10.983,43.967) ; v1(18.645,29.954) 18.645,29.485 20.209,27.921 20.209,27.306 20.635,26.879 U8.8@21.46,26.879
  Bottom Layer w0.15: R11.2@18.257,19.089 R11.2@18.257,19.039 17.642,18.423 17.642,13.473 18.744,12.371 20.865,12.371 21.276,12.781 U9.6@21.844,12.781
  Bottom Layer w0.2: v1(10.983,43.967) 12.852,43.967 18.446,38.374 18.446,23.816 17.323,22.693 17.323,19.206 17.44,19.089 R11.2@18.257,19.089
SDA: R10.2 U7.9 U8.9 U9.5 | length 57.2
  TopLayer w0.2: U7.9@8.667,49.427 8.663,49.424 8.663,48.199 8.659,48.195 11.966,44.888 11.966,42.756 v1(12.391,42.331) ; v1(17.861,29.531) 19.357,28.035 19.357,27.592 20.72,26.229 U8.9@21.46,26.229
  Bottom Layer w0.15: R10.2@16.711,19.089 R10.2@16.711,19.039 15.861,18.189 15.861,12.981 16.771,12.071 21.483,12.071 U9.5@21.844,12.431
  Bottom Layer w0.2: v1(12.391,42.331) 13.855,42.331 17.861,38.325 v1(17.861,29.531) 15.675,29.531 14.637,28.493 14.637,20.214 15.762,19.089 R10.2@16.711,19.089
SMCLK: P1.15 R71.1 | length 9.1
  TopLayer w0.2: P1.15@28.8,1.4 30.021,2.621 v1(30.021,4.904) ; R71.1@31.025,9.554 31.072,9.507 v4(31.072,7.738)
  Layer 2 w0.2: v1(30.021,4.904) 31.072,5.955 v4(31.072,7.738)
SMDAT: P1.13 R70.1 | length 10.1
  TopLayer w0.2: P1.13@28,1.4 28,2.651 29.185,3.835 v1(29.413,3.835) ; v4(31.98,7.771) 31.98,9.532 31.977,9.536 R70.1@31.982,9.541
  Layer 2 w0.2: v1(29.413,3.835) 29.779,3.835 31.98,6.036 v4(31.98,7.771)
SPI_1V8_ADC: C15.1 C75.2 FB6.1 FB7.1 R14.2 R15.2 R98.2 U11.13 U14.10 U14.11 U14.12 U14.13 U14.14 | length 33.5
  TopLayer w0.25: v2(33.191,12.139) 33.191,12.072 33.327,11.936 33.327,11.321 C15.1@33.327,11.319
  TopLayer w0.3: C15.1@33.327,11.321 34.206,11.321 34.309,11.218 U11.13@35.461,11.218
  TopLayer w0.5: R15.2@29.831,30.789 29.831,29.9 29.899,29.832 R14.2@29.899,28.832 29.899,27.3 31.008,26.191 31.008,24.002
  Layer 3 w0.3: v4@29.5,20.808 29.5,20.364 30.516,19.348 30.516,14.279 32.656,12.139 v2(33.191,12.139)
  Layer 3 w0.5: 28.264,31.19 27.159,30.085 27.159,21.62 27.971,20.808 v4@29.5,20.808
  other v4: 29.499,20.777